# Altium PCB MERLIN_Finger_pcb_4x4.PcbDoc
Units mm, origin at the board's own origin, x right, y up, seen from the top; angles counter-clockwise.
Board outline 20.5 x 30 mm, 4 copper layers (L1 (SIG + PWR), L2 (GND), L3 (PWR), L4 (SIG + PWR)), stack 0.771 mm thick; 59 components, 17 nets, 276 pads, 70 vias.
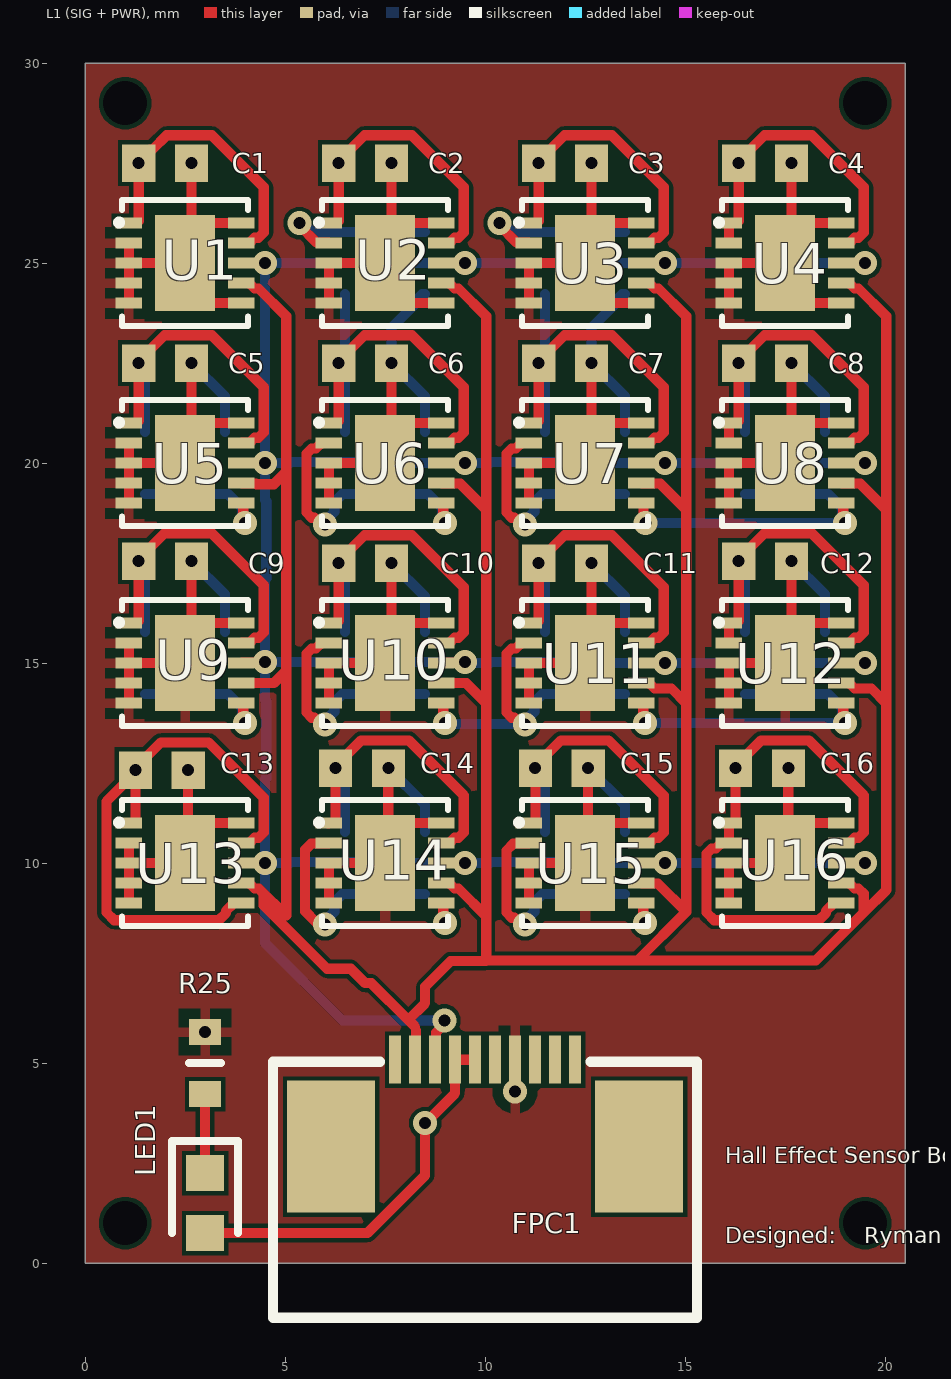
[diagram p0: L1 (SIG + PWR) view]
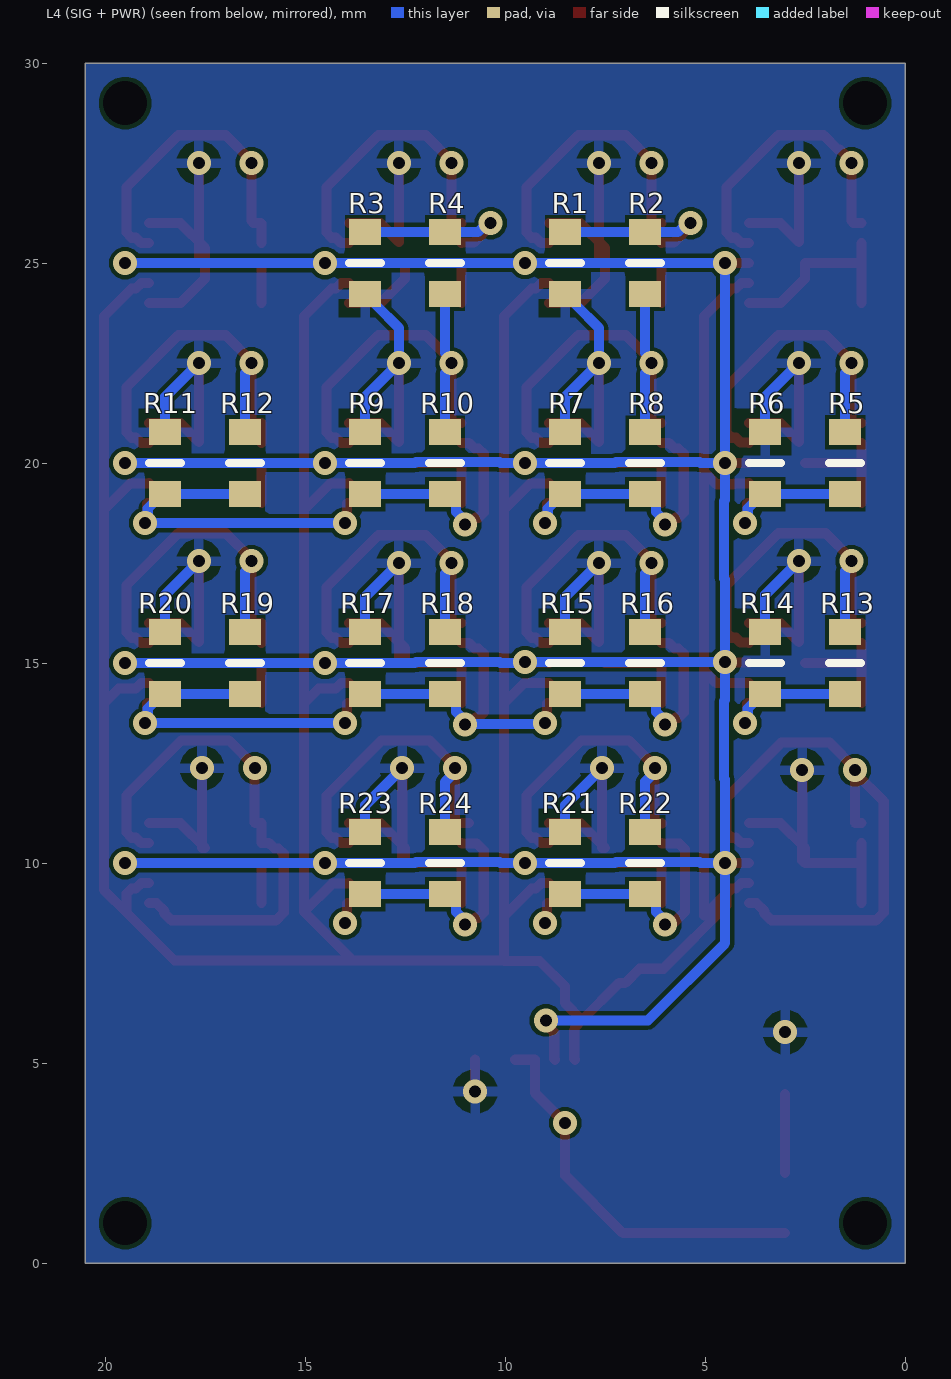
[diagram p1: L4 (SIG + PWR) view, seen from below]
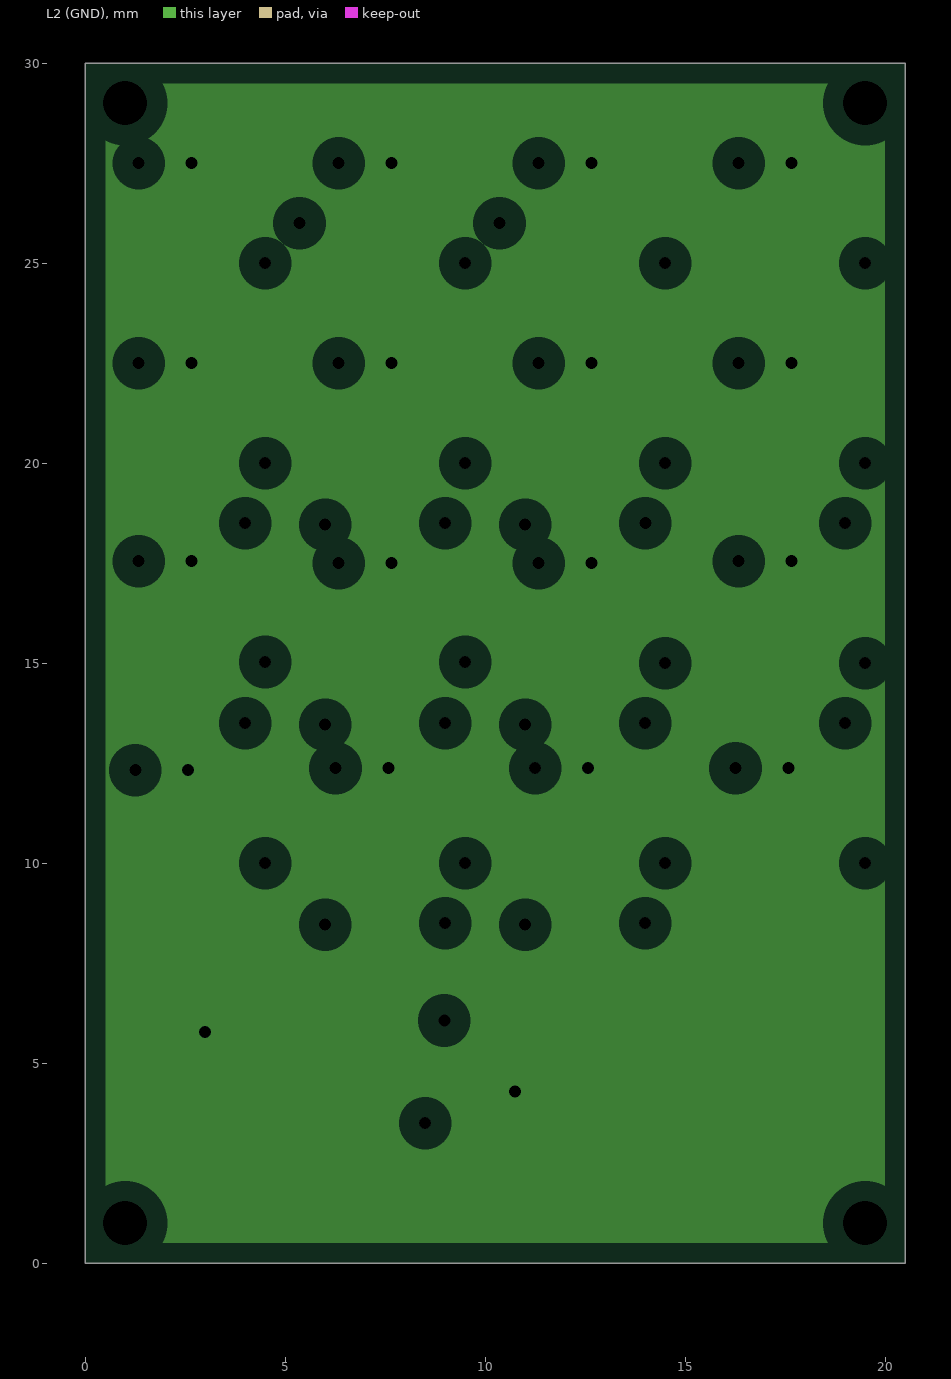
[diagram p2: L2 (GND), clearances drawn from the general rule]
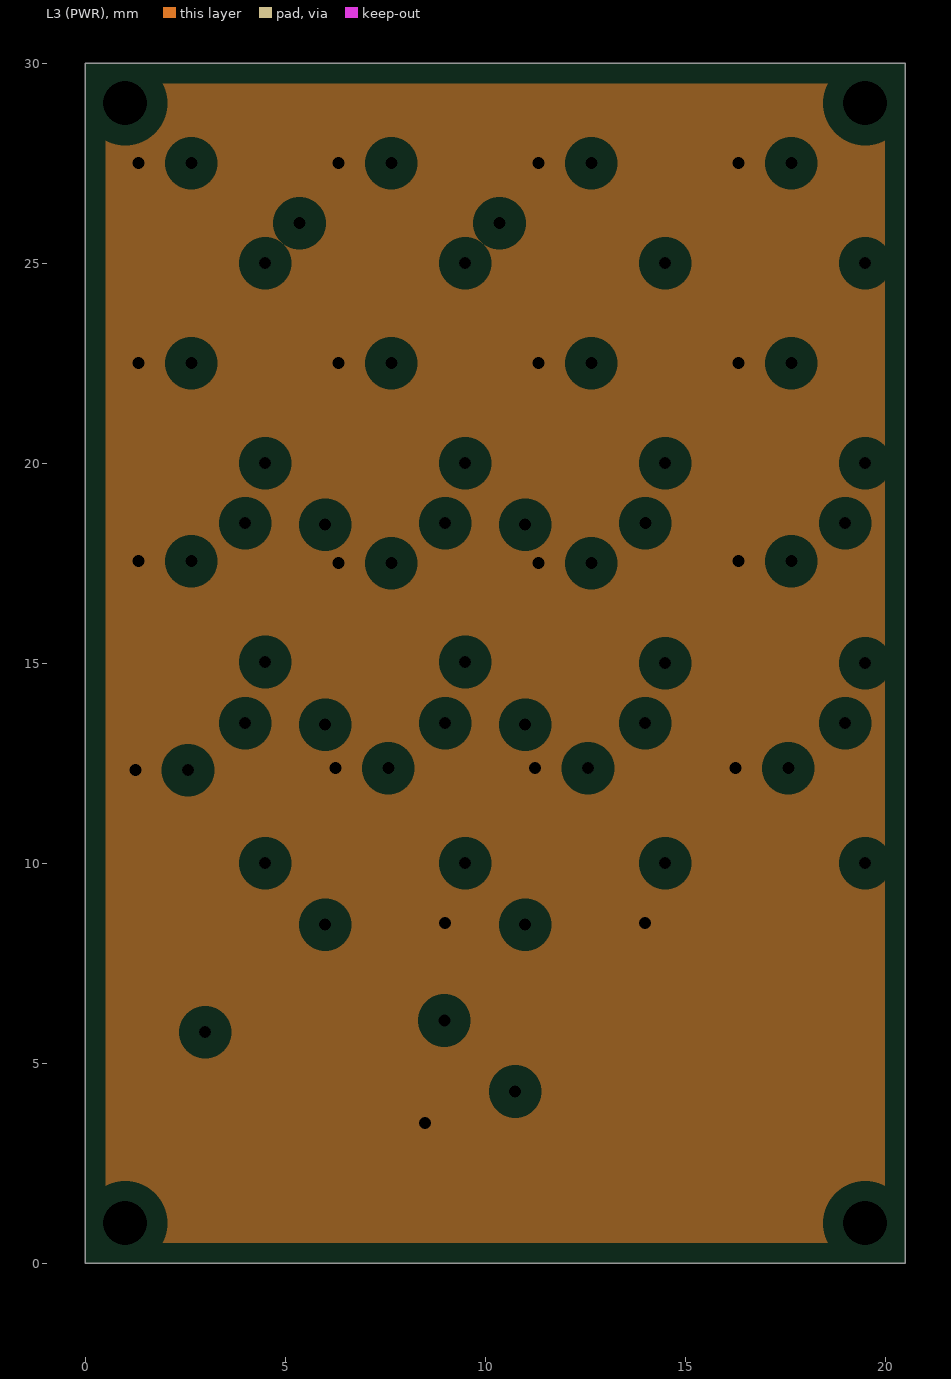
[diagram p3: L3 (PWR), clearances drawn from the general rule]
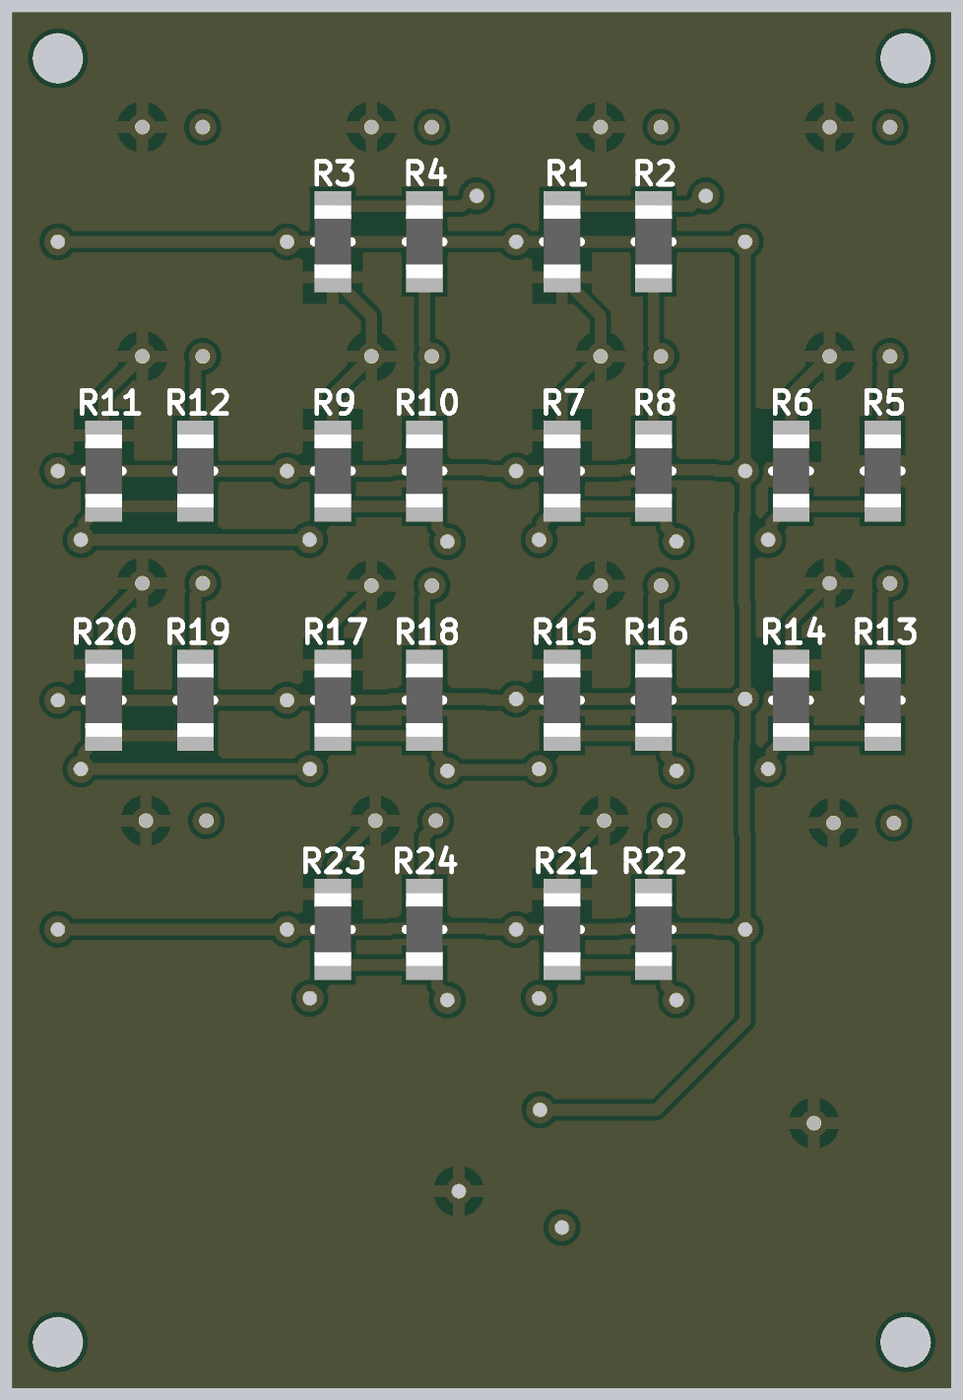
[diagram p4: 3D render of the assembled board from below, using the file's embedded part models]

## Layer stack, top to bottom
Top Solder: solder mask 0.01, Solder Resist, Dk 3.5
L1 (SIG + PWR): signal copper 0.035
Dielectric 2: prepreg 0.2104, PP-006, Dk 4.1
L2 (GND): plane copper 0.0152, net GND
Dielectric 1: dielectric 0.25, FR-4, Dk 4.8
L3 (PWR): plane copper 0.0152, net VCC
Dielectric 3: prepreg 0.2104, PP-006, Dk 4.1
L4 (SIG + PWR): signal copper 0.035
Bottom Solder: solder mask 0.01, Solder Resist, Dk 3.5

## Board outline
0,0 20.5,0 20.5,30 0,30

## Design rules (kind name [scope] priority, off if disabled: settings)
Clearance Clearance_1 [All] p1: gap=0.1 ignorepadtopadclearanceinfootprint=TRUE
Clearance [All] p2: gap=0.254 ignorepadtopadclearanceinfootprint=TRUE except(0.2: Arc-Arc Arc-Track Arc-SMDPad Arc-THPad Arc-Via Arc-Fill Arc-Poly Arc-Region Arc-Text Arc-Hole Track-Track Track-SMDPad Track-THPad Track-Via Track-Fill Track-Poly Track-Region Track-Text Track-Hole SMDPad-SMDPad SMDPad-THPad)
ComponentClearance [All] p1: gap=0.2 collisioncheckmode=3 verticalgap=0.2 showdistances=FALSE
MinimumSolderMaskSliver [All] p1: minsoldermaskwidth=0.1
PlaneClearance [All] p1: clearance=0.508
PlaneConnect [All] p1: planeconnectstyle=Relief reliefexpansion=0.508 reliefentries=4 reliefconductorwidth=0.254 reliefairgap=0.254
PolygonConnect [All] p1: connectstyle=Relief reliefconductorwidth=0.254 reliefentries=4 polygonreliefangle="90 Angle" airgapwidth=0.254
RoutingVias [All] p1: holewidth=0.3 width=0.6 viastyle="Through Hole" minholewidth=0.1 minwidth=0.4 maxholewidth=0.711 maxwidth=1.2
SilkToSolderMaskClearance [IsPad] p1: minsilkscreentomaskgap=0.1 clearancetoexposedcopper=TRUE
SolderMaskExpansion [IsVia] p1: expansion=0 istentingtop=TRUE
SolderMaskExpansion SolderMaskExpansion_1 [All] p2: expansion=0 istentingtop=FALSE
SupplyNets "Schematic Supply Nets_1" [InNet('GND')] p1: voltage=0.000
SupplyNets "Schematic Supply Nets" [InNet('VCC')] p2: voltage=0.000
UnRoutedNet [All] p1: checkbadconnections=TRUE
Width [All] p1: maxlimit=1.2 minlimit=0.2 preferedwidth=0.254
24 further rules are at their usual default settings.

## Classes and differential pairs
component class MERLIN_Finger_4x4: C1 C2 C3 C4 C5 C6 C7 C8 C9 C10 C11 C12 C13 C14 C15 C16 FPC1 LED1 R1 R2 R3 R4 R5 R6 R7 R8 R9 R10 R11 R12 R13 R14 R15 R16 R20 R22 R23 U1 U2 U3 U4 U5 U6 U7 U8 U9 U10 U11 U12 U13 U14 U15 U16

## Components (designator, comment, footprint, x,y, rotation, side; value= is the part's Value field where it differs from the comment)
C1 "0.1uF" CAPC1608X90N 2,27.5 r0 top
C2 "0.1uF" CAPC1608X90N 7,27.5 r180 top
C3 "0.1uF" CAPC1608X90N 12,27.5 r180 top
C4 "0.1uF" CAPC1608X90N 17,27.5 r0 top
C5 "0.1uF" CAPC1608X90N 2,22.5 r180 top
C6 "0.1uF" CAPC1608X90N 7,22.5 r180 top
C7 "0.1uF" CAPC1608X90N 12,22.5 r180 top
C8 "0.1uF" CAPC1608X90N 17,22.5 r180 top
C9 "0.1uF" CAPC1608X90N 2,17.55 r180 top
C10 "0.1uF" CAPC1608X90N 7,17.5 r180 top
C11 "0.1uF" CAPC1608X90N 12,17.5 r180 top
C12 "0.1uF" CAPC1608X90N 17,17.55 r180 top
C13 "0.1uF" CAPC1608X90N 1.916,12.322 r180 top
C14 "0.1uF" CAPC1608X90N 6.922,12.372 r180 top
C15 "0.1uF" CAPC1608X90N 11.916,12.372 r180 top
C16 "0.1uF" CAPC1608X90N 16.922,12.372 r180 top
FPC1 "AFC07-S10ECA-00" FPC-SMD_P0.50-10P_LCS-SJ-H2.0 10,4 r180 top
LED1 "KT-0603R" LEDC1608X70N 3,1.5 r270 top
R1 "100k" 0603WAF3300T5E 8.5,25 r90 bottom
R2 "200k" 0603WAF3300T5E 6.5,25 r270 bottom
R3 "200k" 0603WAF3300T5E 13.5,25 r90 bottom
R4 "100k" 0603WAF3300T5E 11.5,25 r270 bottom
R5 "200k" 0603WAF3300T5E 1.5,20 r90 bottom
R6 "100k" 0603WAF3300T5E 3.5,20 r270 bottom
R7 "100k" 0603WAF3300T5E 8.5,20 r270 bottom
R8 "200k" 0603WAF3300T5E 6.5,20 r90 bottom
R9 "200k" 0603WAF3300T5E 13.5,20 r270 bottom
R10 "100k" 0603WAF3300T5E 11.5,20 r90 bottom
R11 "100k" 0603WAF3300T5E 18.5,20 r270 bottom
R12 "200k" 0603WAF3300T5E 16.5,20 r90 bottom
R13 "100k" 0603WAF3300T5E 1.5,15 r90 bottom
R14 "200k" 0603WAF3300T5E 3.5,15 r270 bottom
R15 "100k" 0603WAF3300T5E 8.5,15 r270 bottom
R16 "200k" 0603WAF3300T5E 6.5,15 r90 bottom
R17 "200k" 0603WAF3300T5E 13.5,15 r270 bottom
R18 "100k" 0603WAF3300T5E 11.5,15 r90 bottom
R19 "100k" 0603WAF3300T5E 16.5,15 r90 bottom
R20 "200k" 0603WAF3300T5E 18.5,15 r270 bottom
R21 "100k" 0603WAF3300T5E 8.5,10 r270 bottom
R22 "200k" 0603WAF3300T5E 6.5,10 r90 bottom
R23 "200k" 0603WAF3300T5E 13.5,10 r270 bottom
R24 "100k" 0603WAF3300T5E 11.5,10 r90 bottom
R25 "1k" 0603WAF3300T5E 3,5 r270 top
U1 "A31301EEJASR-XYZ-IC-20" DFN-10_L3.0-W3.0-P0.50-BL-EP2.4 2.5,25 r270 top
U2 "A31301EEJASR-XYZ-IC-20" DFN-10_L3.0-W3.0-P0.50-BL-EP2.4 7.5,25 r270 top
U3 "A31301EEJASR-XYZ-IC-20" DFN-10_L3.0-W3.0-P0.50-BL-EP2.4 12.5,25 r270 top
U4 "A31301EEJASR-XYZ-IC-20" DFN-10_L3.0-W3.0-P0.50-BL-EP2.4 17.5,25 r270 top
U5 "A31301EEJASR-XYZ-IC-20" DFN-10_L3.0-W3.0-P0.50-BL-EP2.4 2.5,20 r270 top
U6 "A31301EEJASR-XYZ-IC-20" DFN-10_L3.0-W3.0-P0.50-BL-EP2.4 7.5,20 r270 top
U7 "A31301EEJASR-XYZ-IC-20" DFN-10_L3.0-W3.0-P0.50-BL-EP2.4 12.5,20 r270 top
U8 "A31301EEJASR-XYZ-IC-20" DFN-10_L3.0-W3.0-P0.50-BL-EP2.4 17.5,20 r270 top
U9 "A31301EEJASR-XYZ-IC-20" DFN-10_L3.0-W3.0-P0.50-BL-EP2.4 2.5,15 r270 top
U10 "A31301EEJASR-XYZ-IC-20" DFN-10_L3.0-W3.0-P0.50-BL-EP2.4 7.5,15 r270 top
U11 "A31301EEJASR-XYZ-IC-20" DFN-10_L3.0-W3.0-P0.50-BL-EP2.4 12.5,15 r270 top
U12 "A31301EEJASR-XYZ-IC-20" DFN-10_L3.0-W3.0-P0.50-BL-EP2.4 17.5,15 r270 top
U13 "A31301EEJASR-XYZ-IC-20" DFN-10_L3.0-W3.0-P0.50-BL-EP2.4 2.5,10 r270 top
U14 "A31301EEJASR-XYZ-IC-20" DFN-10_L3.0-W3.0-P0.50-BL-EP2.4 7.5,10 r270 top
U15 "A31301EEJASR-XYZ-IC-20" DFN-10_L3.0-W3.0-P0.50-BL-EP2.4 12.5,10 r270 top
U16 "A31301EEJASR-XYZ-IC-20" DFN-10_L3.0-W3.0-P0.50-BL-EP2.4 17.5,10 r270 top

## Footprints (in the part's own frame and the unit in brackets; to place one, negate y for a bottom-side part, rotate by r counter-clockwise, add the part's x,y. Pads: shape width x height; smd on the part's side, far side on the other; paste and mask are expansions set on the pad)
0603WAF3300T5E [mm]
  rect 0.65x0.8 smd: 1(-0.775,0) 2(0.775,0)
  silkscreen extent 0,-0.4 0,0.4, body extent -0.8,-0.4 0.8,0.4, height 0.55
CAPC1608X90N [mm]
  rect 0.83x0.94 smd: 1(-0.66,0) 2(0.66,0)
  body extent -0.81,-0.4 0.79,0.4, height 0.78
DFN-10_L3.0-W3.0-P0.50-BL-EP2.4 [mm]
  rect 0.28x0.665 smd: 1(-1,-1.407) 2(-0.5,-1.407) 3(0,-1.407) 4(0.5,-1.407) 5(1,-1.407) 6(1,1.407) 7(0.5,1.407) 8(0,1.407) 9(-0.5,1.407) 10(-1,1.407)
  rect 2.4x1.5 smd: 11(0,0)
  silkscreen extent -1.58,-1.73 1.58,1.58
FPC-SMD_P0.50-10P_LCS-SJ-H2.0 [mm]
  rect 0.3x1.2 smd: 1(2.25,-1.085) 2(1.75,-1.085) 3(1.25,-1.085) 4(0.75,-1.085) 5(0.25,-1.085) 6(-0.25,-1.085) 7(-0.75,-1.085) 8(-1.25,-1.085) 9(-1.75,-1.085) 10(-2.25,-1.085)
  rect 2.2x3.3 smd: 11(-3.85,1.085) 12(3.85,1.085)
  silkscreen extent -5.3,-1.04 5.3,5.37
LEDC1608X70N [mm]
  rect 0.9x0.95 smd: 1(-0.75,0) 2(0.75,0)
  silkscreen extent -1.55,-0.82 0.75,0.82

## Part data
C1 C2 C3 C4 C5 C6 C7 C8 C9 C10 C11 C12 C13 C14 C15 C16: library part CC0603KRX7R9BB104, "Capacitor", Manufacturer_Name="Yageo Group", Mouser Part Number=603-CC603KRX7R9BB104, Arrow Part Number=CC0603KRX7R9BB104, Arrow Price/Stock=https://www.arrow.com/en/products/cc0603krx7r9bb104/yageo?utm_currency=USD&region=europe, Datasheet Link=https://www.digikey.com/en/products/detail/yageo/CC0603KRX7R9BB104/2103082, Height=0.9mm, Manufacturer_Part_Number=CC0603KRX7R9BB104, Mouser Price/Stock=https://www.mouser.co.uk/ProductDetail/YAGEO/CC0603KRX7R9BB104?qs=vTakOoo5QyLvVCYM2ge8LQ%3D%3D
FPC1: JLCPCB Part Class="Extended Part", LCSC Part Name="抽屉式 上接 P数:10P 间距:0.5mm", Manufacturer=JS(钜硕电子), Add into BOM=yes, Contact Material="Copper Alloy", Contact Plating=Tin, Contact Type="Top Contact", Convert to PCB=yes, Datasheet=https://item.szlcsc.com/datasheet/AFC07-S10ECA-00/253892.html, Device=AFC07-S10ECA-00, FFC, FCB Thickness=0.3mm, Height Above Board=2mm, Locking Feature="Slide Lock", Manufacturer Part=AFC07-S10ECA-00, Mounting Type="Surface Mount, Right Angle", Number of Contacts=10P, Pitch=0.5mm, Supplier=LCSC, Supplier Footprint=SMD,P=0.5mm,卧贴, Supplier Part=C262583, Symbol=AFC07-S10ECA-00
LED1: "LED", Manufacturer_Name="Hubei KENTO Elec", Datasheet Link=https://datasheet.lcsc.com/szlcsc/Hubei-KENTO-Elec-KT-0603R_C2286.pdf, Height=0.7mm, Manufacturer_Part_Number=KT-0603R
R1 R2 R3 R4 R5 R6 R7 R8 R9 R10 R11 R12 R13 R14 R15 R16 R17 R18 R19 R20 R21 R22 R23 R24 R25: library part 0603WAF3300T5E, "Resistor", Manufacturer_Name=ROYALOHM, Mouser Part Number=303-0603WAF3300T5E, Datasheet Link=https://www.mouser.com/datasheet/3/5925/1/1.pdf, Height=0.55mm, Manufacturer_Part_Number=0603WAF3300T5E, Mouser Price/Stock=https://www.mouser.co.uk/ProductDetail/Royalohm/0603WAF3300T5E?qs=e8oIoAS2J1TtsqbFqPpAVg%3D%3D
U1 U2 U3 U4 U5 U6 U7 U8 U9 U10 U11 U12 U13 U14 U15 U16: library part CMP-006-000000-2, Current - Supply=3.8mA, JLCPCB Part Class="Extended Part", LCSC Part Name=??SPI?I2C?????????????3D?????????, Manufacturer=ALLEGRO(?????), Operating Temperature=-40?~+85?, Voltage - Supply=2.65V~3.6V, Add into BOM=yes, Component Type=Standard, Convert to PCB=yes, Datasheet=https://item.szlcsc.com/datasheet/A31301EEJASR-XYZ-IC-20/24162961.html, Design Item ID=A31301EEJASR-XYZ-IC-20, Device=A31301EEJASR-XYZ-IC-20, Interface Type=I2C, Magnetic Sensing Range(X,Y)=±200mT, Magnetic Sensing Range(Z)=±200mT, Manufacturer Part=A31301EEJASR-XYZ-IC-20, Output bit=15bit, Pin Count=11, Source=A31301EEJASR-XYZ-IC-201_A31301EEJASR-XYZ-IC-20.SCHLIB, Supplier Footprint=DFN-10-EP(3x3), Supplier Part=C22465894, Symbol=A31301EEJASR-XYZ-IC-20

## Free pads (board coordinates)
  round 0 hole 1.1 unplated: 13(1,1) 13(1,29) 13(19.5,1) 13(19.5,29)

## Via types
v1: diameter 0.6, hole 0.3, L1 (SIG + PWR) to L4 (SIG + PWR), tented both sides, 70 vias

## Nets (pads, with @x,y where several pads share a name; then routed paths per layer and width w, separated by ;. In a path a pad name is that pad's centre, name@x,y a point inside that pad or via, vN(x,y) a via of type N, cw(c..) or ccw(c..) an arc to the next point about the centre after c; other vN are vias at no path point)
GND: C1.2 C2.1 C3.1 C4.2 C5.1 C6.1 C7.1 C8.1 C9.1 C10.1 C11.1 C12.1 C13.1 C14.1 C15.1 C16.1 FPC1.7 R1.1 R3.1 R6.1 R7.1 R9.1 R11.1 R14.1 R15.1 R17.1 R20.1 R21.1 R23.1 R25.1 U1.2 U1.3 U1.4 U1.5 U1.6 U1.10 U1.11 U2.3 U2.4 U2.5 U2.6 U2.10 U2.11 U3.3 U3.4 U3.5 U3.6 U3.10 U3.11 U4.3 U4.4 U4.5 U4.6 U4.10 U4.11 U5.2 U5.3 U5.4 U5.5 U5.10 U5.11 U6.3 U6.4 U6.5 U6.10 U6.11 U7.3 U7.4 U7.5 U7.10 U7.11 U8.3 U8.4 U8.5 U8.10 U8.11 U9.2 U9.3 U9.4 U9.5 U9.10 U9.11 U10.3 U10.4 U10.5 U10.10 U10.11 U11.3 U11.4 U11.5 U11.10 U11.11 U12.3 U12.4 U12.5 U12.10 U12.11 U13.2 U13.3 U13.4 U13.5 U13.10 U13.11 U14.3 U14.4 U14.5 U14.10 U14.11 U15.3 U15.4 U15.5 U15.10 U15.11 U16.3 U16.4 U16.5 U16.10 U16.11 | length 135.2
  L1 (SIG + PWR) w0.254: U13.5 U13.4 U13.3 ; U13.2 U13.3 ; U9.5 U9.4 U9.3 ; U9.2 U9.3 ; U5.5 U5.4 U5.3 ; U5.2 U5.3 ; U1.5 U1.4 U1.3 ; U1.2 U1.3 ; U9.11 U9.3 ; U5.11 U5.3 ; v1(2.573,12.324) 2.573,10.073 U13.11 ; v1(2.657,17.551) 2.657,15.534 3.123,16 U9.10 ; v1(2.657,22.501) 2.657,20.534 3.123,21 U5.10 ; v1(2.657,27.501) 2.657,25.534 3.123,26 U1.10 ; U13.10 3.123,11 2.5,10.377 U13.11 ; U1.6 3.123,24 2.5,24.623 U1.11 U1.3 ; U14.5 U14.4 U14.3 U14.11 ; U10.5 U10.4 U10.3 U10.11 ; U6.5 U6.4 U6.3 U6.11 ; U2.5 U2.4 U2.3 U2.11 ; U14.11@7.5,10.377 8.123,11 U14.10 ; U14.11@7.579,10.377 v1(7.579,12.374) ; v1(7.657,17.501) 7.657,15.534 8.123,16 U10.10 ; v1(7.657,22.501) 7.657,20.534 8.123,21 U6.10 ; v1(7.657,27.501) 7.657,25.157 U2.11 ; U2.6 8.123,24 7.5,24.623 U2.11 ; U2.10 8.123,26 7.5,25.377 U2.11 ; v1(10.75,4.291) FPC1.7 ; U15.5 U15.4 U15.3 U15.11 ; U11.5 U11.4 U11.3 U11.11 ; U7.5 U7.4 U7.3 U7.11 ; U3.5 U3.3 U3.11 12.5,24.623 13.123,24 U3.6 ; v1(12.573,12.374) 12.573,10.073 U15.11 ; v1(12.657,17.501) U11.11@12.657,15.534 ; v1(12.657,22.501) 12.657,20.534 13.123,21 U7.10 ; v1(12.657,27.501) 12.657,25.534 13.123,26 U3.10 ; U15.10 13.123,11 12.5,10.377 U15.11 ; U11.10 13.123,16 U11.11@12.657,15.534 ; U16.5 U16.4 U16.3 U16.11 ; U12.5 U12.4 U12.3 U12.11 ; U8.5 U8.4 U8.3 U8.11 ; U4.5 U4.4 U4.3 U4.11 ; U16.11@17.5,10.377 18.123,11 U16.10 ; U16.11@17.579,10.377 v1(17.579,12.374) ; v1(17.657,17.551) 17.657,15.534 18.123,16 U12.10 ; v1(17.657,22.501) 17.657,20.534 18.123,21 U8.10 ; v1(17.657,27.501) 17.657,25.157 U4.11 ; U4.6 18.123,24 17.5,24.623 U4.11 ; U4.10 18.123,26 17.5,25.377 U4.11 ; U13.3 U13.11 ; U11.11 12.657,15.157 U11.11@12.657,15.534 ; U11.11 12.5,15.377 U11.11@12.657,15.534
  L4 (SIG + PWR) w0.254: v1(2.657,17.551) 3.5,16.708 R14.1 ; v1(2.657,22.501) 3.5,21.658 R6.1 ; v1(7.579,12.374) 8.5,11.452 R21.1 ; v1(7.657,17.501) 8.5,16.658 R15.1 ; R7.1 8.5,21.658 v1(7.657,22.501) 7.657,23.382 8.227,23.952 8.227,24.027 8.425,24.225 R1.1 ; v1(12.573,12.374) 13.5,11.446 R23.1 ; v1(12.657,17.501) 13.5,16.658 R17.1 ; R9.1 13.5,21.658 v1(12.657,22.501) 12.657,23.382 13.227,23.952 13.227,24.027 13.425,24.225 R3.1 ; v1(17.657,17.551) 18.5,16.708 R20.1 ; v1(17.657,22.501) 18.5,21.658 R11.1
  other v1: 3,5.775
NetFPC1_2: FPC1.2 U1.7 U2.7 U3.7 U4.7 U5.7 U6.7 U7.7 U8.7 U9.7 U10.7 U11.7 U12.7 U13.7 U14.7 U15.7 U16.7 | length 103.8
  L1 (SIG + PWR) w0.254: U13.7 4.1,9.5 4.233,9.367 4.334,9.367 ; U9.7 4.718,14.5 5.027,14.809 ; U5.7 3.92,19.487 4.268,19.487 4.282,19.473 4.718,19.473 5.027,19.782 ; U1.7 4.1,24.5 4.233,24.367 4.334,24.367 5.027,23.674 5.027,19.782 ; FPC1.2 8.273,5.108 8.273,5.442 8.273,5.81 ; 8.25,5.907 8.078,6.078 ; U14.7 9.1,9.5 9.233,9.367 9.334,9.367 10.027,8.674 ; U10.7 9.527,14.5 10.027,14 ; U6.7 8.92,19.487 9.377,19.487 10.027,18.837 ; U2.7 9.1,24.5 9.233,24.367 9.334,24.367 10.027,23.674 10.027,18.837 ; 10.018,7.555 9.141,7.555 8.5,6.914 8.5,6.5 8.078,6.078 ; U15.7 13.92,9.487 14.322,9.487 15.027,8.782 ; U11.7 14.1,14.5 14.233,14.367 14.66,14.367 15.027,14 ; U7.7 13.92,19.487 14.377,19.487 15.027,18.837 ; U3.7 14.1,24.5 14.233,24.367 14.334,24.367 15.027,23.674 15.027,18.837 ; U16.7 19.1,9.5 19.233,9.367 19.334,9.367 19.467,9.234 19.467,8.766 ; U12.7 19.1,14.5 19.233,14.367 19.66,14.367 20.027,14 ; U8.7 18.92,19.487 19.377,19.487 20.027,18.837 ; U4.7 19.1,24.5 19.233,24.367 19.334,24.367 20.027,23.674 20.027,18.837 ; 4.334,9.367 4.348,9.367 5.027,8.688 5.027,14.809 ; 4.334,9.367 4.467,9.234 4.467,8.94 6.048,7.36 6.64,7.36 7,7 7.157,7 8.078,6.078 ; 5.027,14.809 5.027,19.782 ; 10.027,8.674 10.027,7.564 13.809,7.564 ; 10.027,8.674 10.027,14 ; 10.027,14 10.027,18.837 ; 13.809,7.564 18.265,7.564 19.467,8.766 ; 13.809,7.564 15.027,8.782 ; 15.027,8.782 15.027,14 ; 15.027,14 15.027,18.837 ; 19.467,8.766 20.027,9.326 20.027,14 ; 20.027,14 20.027,18.837
NetFPC1_3: FPC1.3 U1.8 U2.8 U3.8 U4.8 U5.8 U6.8 U7.8 U8.8 U9.8 U10.8 U11.8 U12.8 U13.8 U14.8 U15.8 U16.8 | length 93
  L1 (SIG + PWR) w0.254: U13.8 v1(4.5,10) ; U9.8 3.92,15.013 4.486,15.013 v1(4.5,15.027) ; U5.8 v1(4.5,20) ; U1.8 v1(4.5,25) ; FPC1.3 8.773,5.108 8.773,5.767 8.979,5.973 v1(8.979,6.066) ; U14.8 v1(9.5,10) ; U10.8 8.92,15.013 9.486,15.013 v1(9.5,15.027) ; U6.8 v1(9.5,20) ; U2.8 v1(9.5,25) ; U15.8 v1(14.5,10) ; U11.8 v1(14.5,15) ; U7.8 v1(14.5,20) ; U3.8 v1(14.5,25) ; U16.8 v1(19.5,10) ; U12.8 v1(19.5,15) ; U8.8 v1(19.5,20) ; U4.8 v1(19.5,25)
  L4 (SIG + PWR) w0.254: v1@4.515,15 4.542,15.027 v1(9.5,15.027) ; v1(8.979,6.066) 6.434,6.066 4.5,8 v1(4.5,10) ; v1@9.5,15 10.115,15 10.142,15.027 12.227,15.027 12.254,15 v1(14.5,15) v1(19.5,15) ; v1(19.5,10) v1(14.5,10) 12.254,10 12.227,10.027 10.142,10.027 10.115,10 v1(9.5,10) 7.254,10 7.227,10.027 5.142,10.027 5.115,10 v1(4.5,10) ; v1(19.5,20) v1(14.5,20) 12.254,20 12.227,20.027 10.142,20.027 10.115,20 v1(9.5,20) 7.254,20 7.227,20.027 5.142,20.027 5.115,20 v1(4.5,20) ; v1(19.5,25) v1(14.5,25) v1(9.5,25) v1(4.5,25) v1(4.5,20) ; v1(4.5,10) 4.5,12.09 4.527,12.117 4.527,14.047 4.5,14.074 v1(4.5,15.027) 4.5,17.09 4.527,17.117 4.527,19.047 4.5,19.074 v1(4.5,20)
NetLED1_1: LED1.1 R25.2 | length 2
  L1 (SIG + PWR) w0.254: LED1.1 R25.2
NetR1_2: R1.2 R2.1 U2.2 | length 4.2
  L1 (SIG + PWR) w0.254: v1(5.36,26) 5.36,25.939 5.786,25.513 6.08,25.513 U2.2
  L4 (SIG + PWR) w0.254: v1(5.36,26) 5.454,26 5.679,25.775 R2.1 R1.2
NetR3_2: R3.2 R4.1 U3.2 | length 4.2
  L1 (SIG + PWR) w0.254: v1(10.36,26) 10.36,25.939 10.786,25.513 11.08,25.513 U3.2
  L4 (SIG + PWR) w0.254: v1(10.36,26) 10.454,26 10.679,25.775 R4.1 R3.2
NetR5_1: R5.1 R6.2 U5.6 | length 3.5
  L1 (SIG + PWR) w0.254: U5.6 3.941,19 3.954,18.987 3.954,18.546 v1(4,18.5)
  L4 (SIG + PWR) w0.254: R5.1 3.575,19.225 3.934,18.866 3.934,18.566 v1(4,18.5)
NetR7_2: R7.2 R8.1 U6.2 U6.6 | length 7.3
  L1 (SIG + PWR) w0.254: v1(6,18.46) 5.906,18.46 5.733,18.633 5.666,18.633 5.533,18.766 5.533,20.234 5.666,20.367 5.767,20.367 5.9,20.5 U6.2 ; U6.6 8.941,19 8.954,18.987 8.954,18.546 v1(9,18.5)
  L4 (SIG + PWR) w0.254: v1(6,18.46) 6,18.554 6.227,18.781 6.227,19.027 6.425,19.225 8.575,19.225 8.934,18.866 8.934,18.566 v1(9,18.5)
NetR9_2: R9.2 R10.1 U7.2 | length 5.7
  L1 (SIG + PWR) w0.254: v1(11,18.46) 10.906,18.46 10.733,18.633 10.666,18.633 10.533,18.766 10.533,20.234 10.666,20.367 10.767,20.367 10.9,20.5 U7.2
  L4 (SIG + PWR) w0.254: v1(11,18.46) 11,18.554 11.227,18.781 11.227,19.027 11.425,19.225 R9.2
NetR11_2: R11.2 R12.1 U7.6 U8.6 | length 9.1
  L1 (SIG + PWR) w0.254: U7.6 13.944,19 13.957,18.987 13.957,18.551 v1(14.007,18.501) ; U8.6 18.941,19 18.954,18.987 18.954,18.546 v1(19,18.5)
  L4 (SIG + PWR) w0.254: v1(14.007,18.501) v1@18.999,18.501 ; R12.1 R11.2 18.575,19.225 18.934,18.866 18.934,18.566 v1(19,18.5)
NetR13_1: R13.1 R14.2 U9.6 | length 3.5
  L1 (SIG + PWR) w0.254: U9.6 3.941,14 3.954,13.987 3.954,13.546 v1(4,13.5)
  L4 (SIG + PWR) w0.254: R13.1 3.575,14.225 3.934,13.866 3.934,13.566 v1(4,13.5)
NetR15_2: R15.2 R16.1 U10.2 | length 5.7
  L1 (SIG + PWR) w0.254: v1(6,13.46) 5.906,13.46 5.733,13.633 5.666,13.633 5.533,13.766 5.533,15.234 5.666,15.367 5.767,15.367 5.9,15.5 U10.2
  L4 (SIG + PWR) w0.254: v1(6,13.46) 6,13.554 6.227,13.781 6.227,14.027 6.425,14.225 R16.1 R15.2
NetR17_2: R17.2 R18.1 U10.6 U11.2 | length 8.3
  L1 (SIG + PWR) w0.254: U10.6 8.941,14 8.954,13.987 8.954,13.546 v1(9,13.5) ; v1(11,13.46) 10.906,13.46 10.733,13.633 10.666,13.633 10.533,13.766 10.533,15.234 10.666,15.367 10.767,15.367 10.9,15.5 U11.2
  L4 (SIG + PWR) w0.254: v1(9,13.5) 9.02,13.48 10.98,13.48 v1(11,13.46) 11,13.554 11.227,13.781 11.227,14.027 11.425,14.225 R17.2
NetR19_1: R19.1 R20.2 U11.6 U12.6 | length 9.1
  L1 (SIG + PWR) w0.254: U11.6 13.941,14 13.954,13.987 13.954,13.546 v1(14,13.5) ; U12.6 18.941,14 18.954,13.987 18.954,13.546 v1(19,13.5)
  L4 (SIG + PWR) w0.254: v1(14,13.5) v1(19,13.5) 18.934,13.566 18.934,13.866 18.575,14.225 R20.2 R19.1
NetR21_2: R21.2 R22.1 U14.2 | length 5.9
  L1 (SIG + PWR) w0.254: v1(6,8.46) 5.934,8.526 5.773,8.526 5.5,8.799 5.5,10.338 5.649,10.487 6.08,10.487 U14.2
  L4 (SIG + PWR) w0.254: v1(6,8.46) 6,8.554 6.227,8.781 6.227,9.027 6.425,9.225 R21.2
NetR23_2: R23.2 R24.1 U15.2 | length 5.8
  L1 (SIG + PWR) w0.254: v1(11,8.46) 10.906,8.46 10.733,8.633 10.666,8.633 10.533,8.766 10.533,10.315 10.705,10.487 11.08,10.487 U15.2
  L4 (SIG + PWR) w0.254: v1(11,8.46) 11,8.554 11.227,8.781 11.227,9.027 11.425,9.225 R23.2
VCC: C1.1 C2.2 C3.2 C4.1 C5.2 C6.2 C7.2 C8.2 C9.2 C10.2 C11.2 C12.2 C13.2 C14.2 C15.2 C16.2 FPC1.4 FPC1.5 LED1.2 R2.2 R4.2 R5.2 R8.2 R10.2 R12.2 R13.2 R16.2 R18.2 R19.2 R22.2 R24.2 U1.1 U1.9 U2.1 U2.9 U3.1 U3.9 U4.1 U4.2 U4.9 U5.1 U5.9 U6.1 U6.9 U7.1 U7.9 U8.1 U8.2 U8.9 U9.1 U9.9 U10.1 U10.9 U11.1 U11.9 U12.1 U12.2 U12.9 U13.1 U13.6 U13.9 U14.1 U14.6 U14.9 U15.1 U15.6 U15.9 U16.1 U16.2 U16.6 U16.9 | length 166.8
  L1 (SIG + PWR) w0.254: U13.1 1.243,11 1.256,11.013 C13.2@1.256,12.267 ; U9.1 1.285,16 1.34,16.055 v1(1.34,17.55) 1.34,17.605 1.982,18.247 3.169,18.247 4.467,16.949 4.467,15.766 4.334,15.633 4.233,15.633 4.113,15.513 3.92,15.513 U9.9 ; U5.1 1.285,21 1.34,21.055 v1(1.34,22.5) 1.34,22.555 1.982,23.197 3.169,23.197 4.467,21.899 4.467,20.766 4.334,20.633 4.233,20.633 4.113,20.513 3.92,20.513 U5.9 ; U1.1 1.285,26 1.34,26.055 1.34,27.555 1.628,27.843 1.683,27.843 2.037,28.197 3.169,28.197 4.467,26.899 4.467,25.766 4.334,25.633 4.233,25.633 4.1,25.5 U1.9 ; v1(1.256,12.322) C13.2@1.256,12.267 ; C13.2@1.256,12.377 1.898,13.019 3.085,13.019 4.467,11.637 4.467,10.766 4.334,10.633 4.233,10.633 4.1,10.5 U13.9 ; LED1.2 7.056,0.75 8.5,2.194 v1(8.5,3.5) 9.25,4.25 FPC1.4 FPC1.5 ; U13.6 3.715,9 3.522,8.807 3.522,8.751 3.344,8.573 0.726,8.573 0.533,8.766 0.533,11.545 C13.2@1.256,12.267 ; U14.1@6.08,10.987 U14.1 6.249,11 6.262,11.013 C14.2 ; U10.1 6.285,16 6.34,16.055 C10.2 ; U6.1 6.285,21 6.34,21.055 v1(6.34,22.5) 6.34,22.555 6.982,23.197 8.169,23.197 9.467,21.899 9.467,20.766 9.334,20.633 9.233,20.633 9.1,20.5 U6.9 ; U2.1 6.285,26 6.34,26.055 v1(6.34,27.5) 6.34,27.555 6.982,28.197 8.169,28.197 9.467,26.899 9.467,25.766 9.334,25.633 9.233,25.633 9.1,25.5 U2.9 ; v1(6.259,12.374) 6.259,12.424 6.904,13.069 8.091,13.069 9.467,11.693 9.467,10.766 9.334,10.633 9.233,10.633 9.1,10.5 U14.9 ; v1(6.337,17.501) 6.337,17.552 6.982,18.197 8.169,18.197 9.467,16.899 9.467,15.766 9.334,15.633 9.233,15.633 9.1,15.5 U10.9 ; U14.6 8.941,9 8.954,8.987 8.954,8.546 v1(9,8.5) ; U15.1@10.9,11 11.243,11 11.256,11.013 C15.2 ; U11.1 11.285,16 11.34,16.055 C11.2 ; U7.1 11.285,21 11.34,21.055 v1(11.34,22.5) 11.34,22.555 11.982,23.197 13.169,23.197 14.467,21.899 14.467,20.766 14.334,20.633 14.233,20.633 14.1,20.5 U7.9 ; U3.1 11.285,26 11.34,26.055 v1(11.34,27.5) 11.34,27.555 11.982,28.197 13.169,28.197 14.467,26.899 14.467,25.766 14.334,25.633 14.233,25.633 14.1,25.5 U3.9 ; v1(11.253,12.374) 11.253,12.424 11.898,13.069 13.085,13.069 14.467,11.687 14.467,10.766 14.334,10.633 14.233,10.633 14.1,10.5 U15.9 ; v1(11.337,17.501) 11.337,17.552 11.982,18.197 13.169,18.197 14.467,16.899 14.467,15.766 14.334,15.633 14.233,15.633 14.1,15.5 U11.9 ; U15.6 13.941,9 13.954,8.987 13.954,8.546 v1(14,8.5) ; U12.2 U12.1 16.285,16 16.34,16.055 C12.2 ; U8.2 U8.1 16.285,21 16.34,21.055 v1(16.34,22.5) 16.34,22.555 16.982,23.197 18.169,23.197 19.467,21.899 19.467,20.766 19.334,20.633 19.233,20.633 19.1,20.5 U8.9 ; U4.2 16.093,25.987 16.106,26 16.285,26 16.34,26.055 v1(16.34,27.5) 16.34,27.555 16.982,28.197 18.169,28.197 19.467,26.899 19.467,25.766 19.334,25.633 19.233,25.633 19.1,25.5 U4.9 ; v1(16.259,12.374) 16.259,12.424 16.904,13.069 18.091,13.069 19.467,11.693 19.467,10.766 19.334,10.633 19.233,10.633 19.1,10.5 U16.9 ; C16.2 16.262,11.013 16.249,11 U16.1 U16.2 15.9,10.5 15.767,10.367 15.666,10.367 15.533,10.234 15.533,8.766 15.726,8.573 18.344,8.573 18.522,8.751 18.522,8.807 18.715,9 U16.6 ; v1(16.337,17.551) 16.337,17.602 16.982,18.247 18.169,18.247 19.467,16.949 19.467,15.766 19.334,15.633 19.233,15.633 19.1,15.5 U12.9
  L4 (SIG + PWR) w0.254: v1(1.34,17.55) 1.34,17.456 1.5,17.296 R13.2 ; v1(1.34,22.5) 1.34,22.406 1.5,22.246 R5.2 ; v1(6.259,12.374) 6.259,12.28 6.5,12.039 R22.2 ; v1(6.337,17.501) 6.337,17.408 6.5,17.245 R16.2 ; R8.2 6.5,22.246 6.34,22.406 v1(6.34,22.5) 6.34,22.594 6.5,22.754 R2.2 ; v1(11.253,12.374) 11.253,12.28 11.5,12.033 R24.2 ; v1(11.337,17.501) 11.337,17.408 11.5,17.245 R18.2 ; R10.2 11.5,22.246 11.34,22.406 v1(11.34,22.5) 11.34,22.594 11.5,22.754 R4.2 ; v1(16.337,17.551) 16.337,17.458 16.5,17.295 R19.2 ; v1(16.34,22.5) 16.34,22.406 16.5,22.246 R12.2
  other v1: 1.34,27.5
pads on no net: FPC1.1 FPC1.6 FPC1.8 FPC1.9 FPC1.10 FPC1.11 FPC1.12

## Polygon pours and split planes (outlines as drawn)
GND on L4 (SIG + PWR) "GND_L04_P000" (solid, pour order 0): 0,30 20.5,30 20.5,0 0,0
GND on L1 (SIG + PWR) "GND_L01_P001" (solid, pour order 1): 0,30 20.5,30 20.5,0 0,0
VCC on L3 (PWR) (split plane): 19.99,0.51 0.51,0.51 0.51,29.49 19.99,29.49
GND on L2 (GND) (split plane): 19.99,0.51 0.51,0.51 0.51,29.49 19.99,29.49

## Silkscreen, mask and mechanical layers (free items; w line width, h text height)
Top Overlay:
  text "Hall Effect Sensor Board     Ver 2.0" at 16,2.5 h0.4
  text "Designed:    Ryman" at 16,0.5 h0.4